# Altium PCB Sound_Sensor.PcbDoc (part 1 of 3)
Units mil, origin at the board's own origin, x right, y up, seen from the top; angles counter-clockwise.
Board outline 3543.31 x 3543.31 mil, 2 copper layers (Top Layer, Bottom Layer), stack 57 mil thick; 199 components, 167 nets, 606 pads, 246 vias.
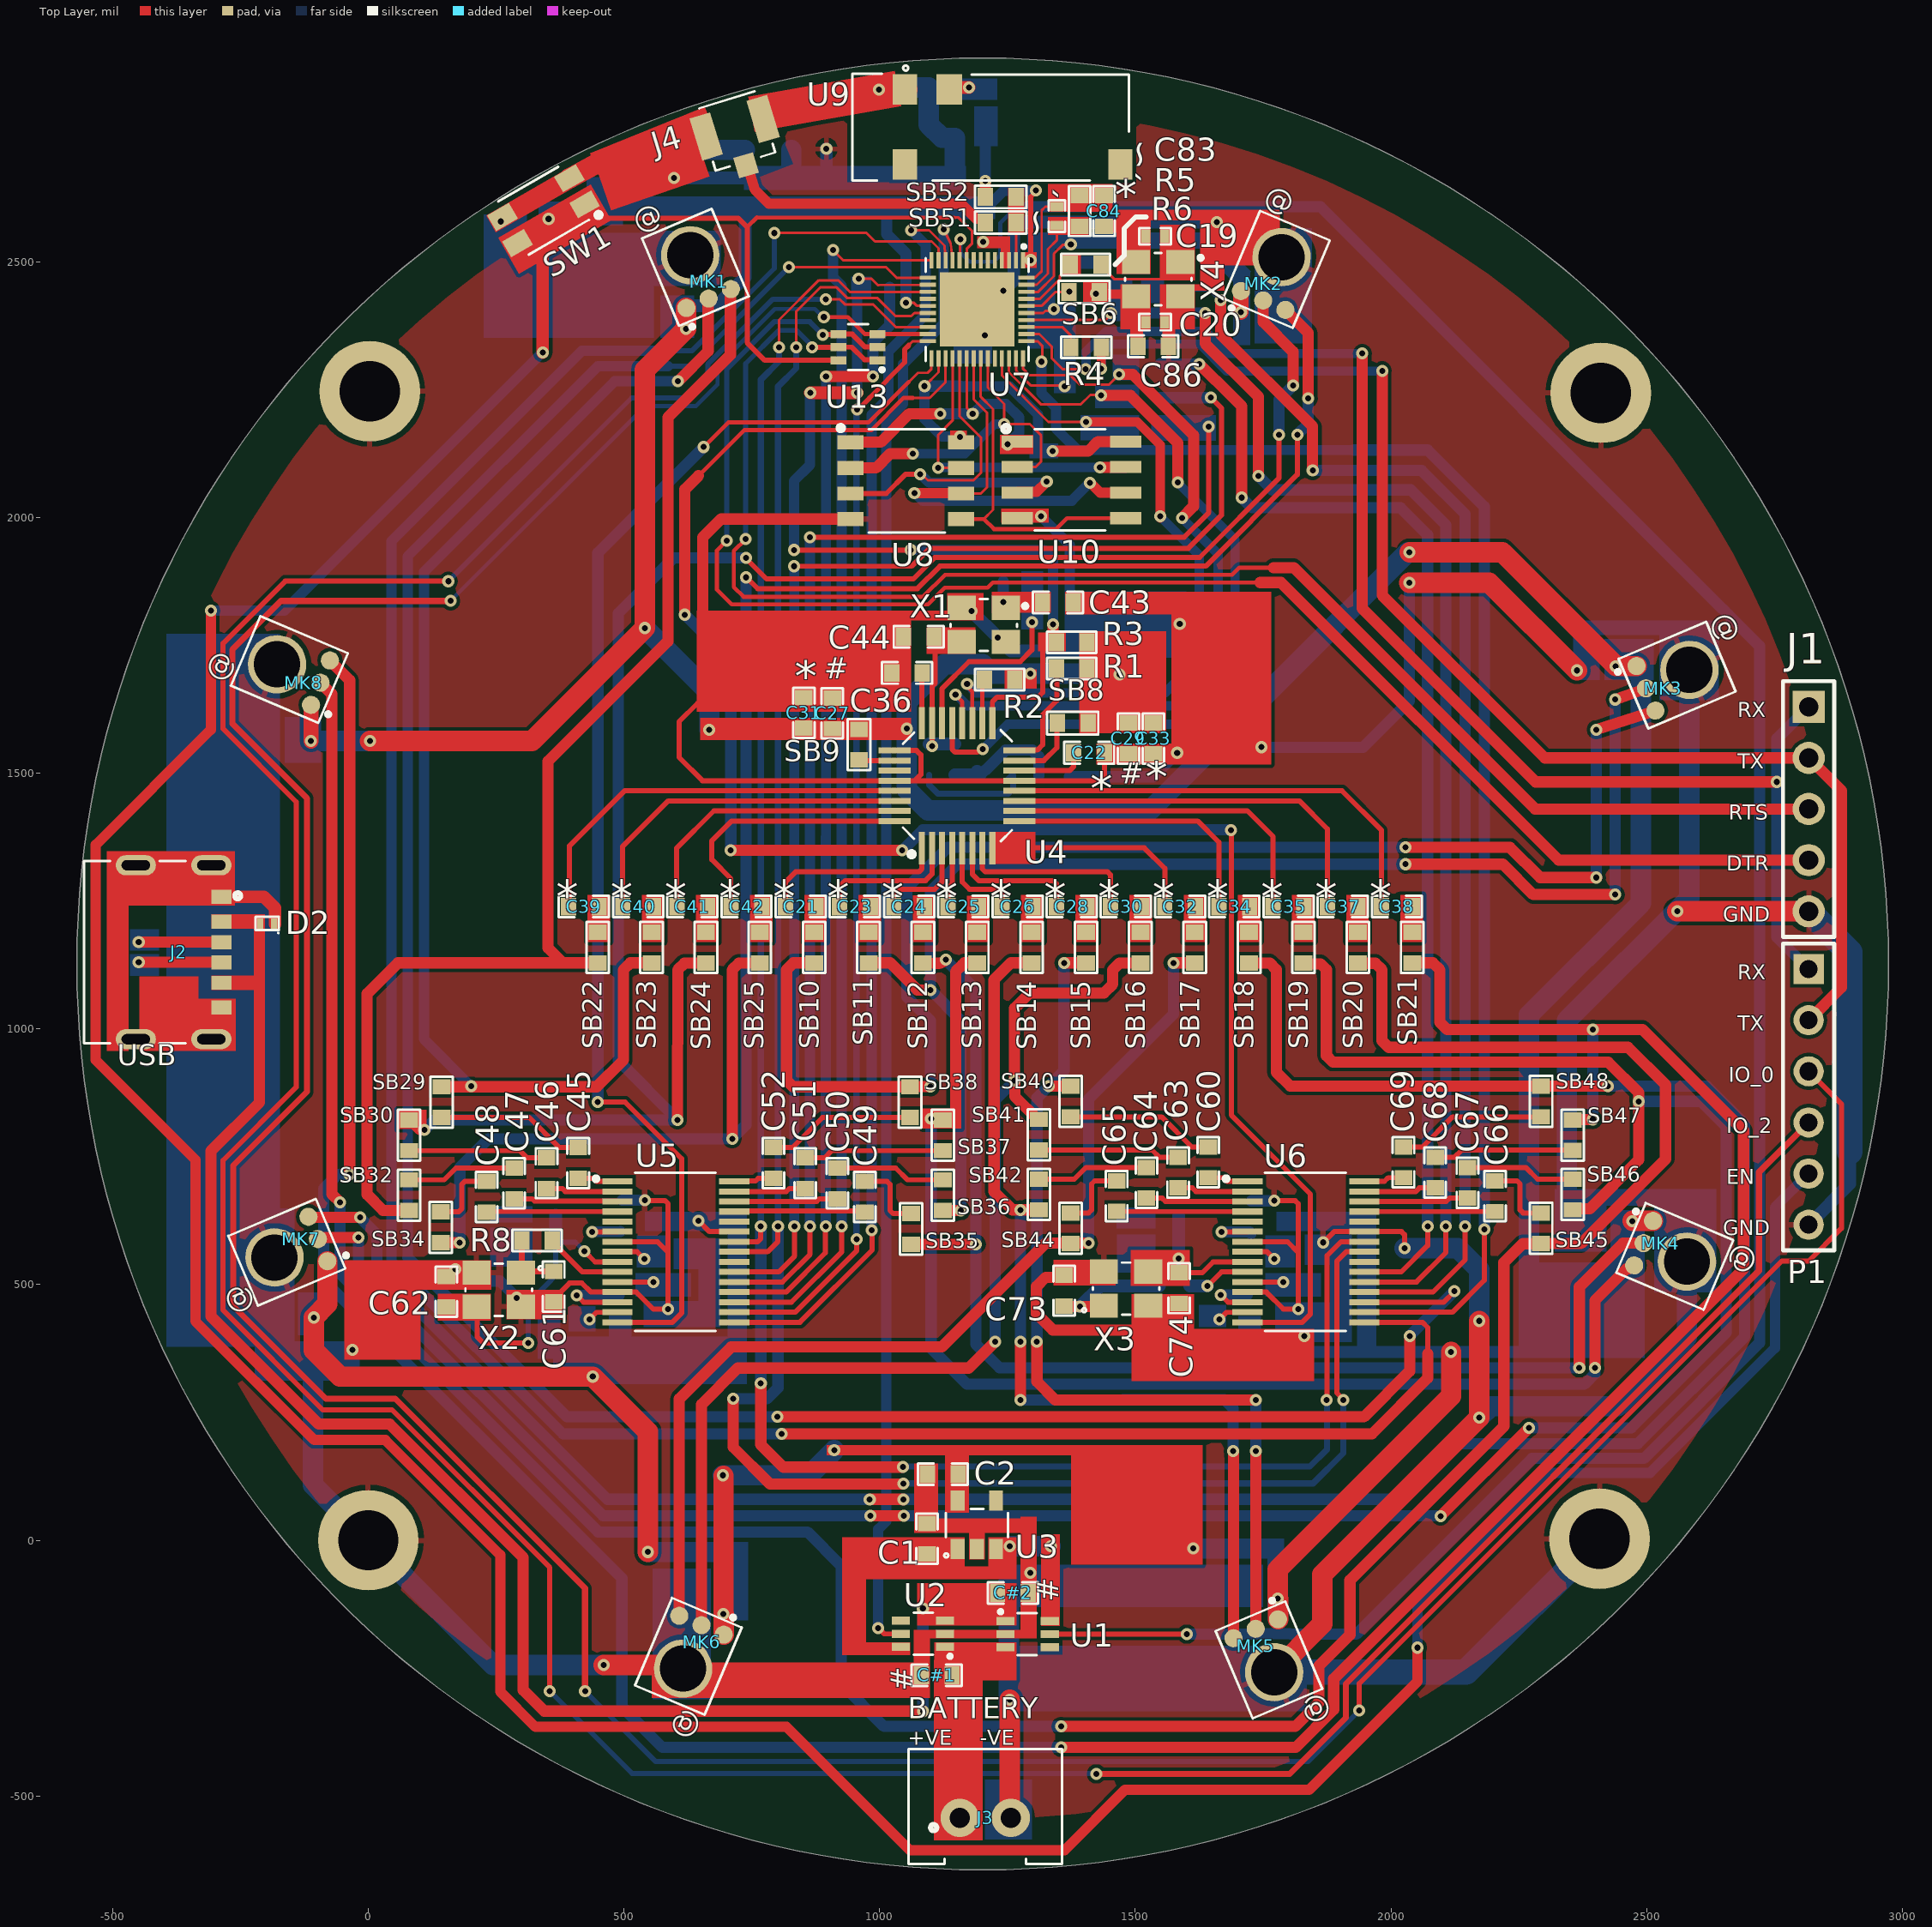
[diagram p0: Top Layer view]
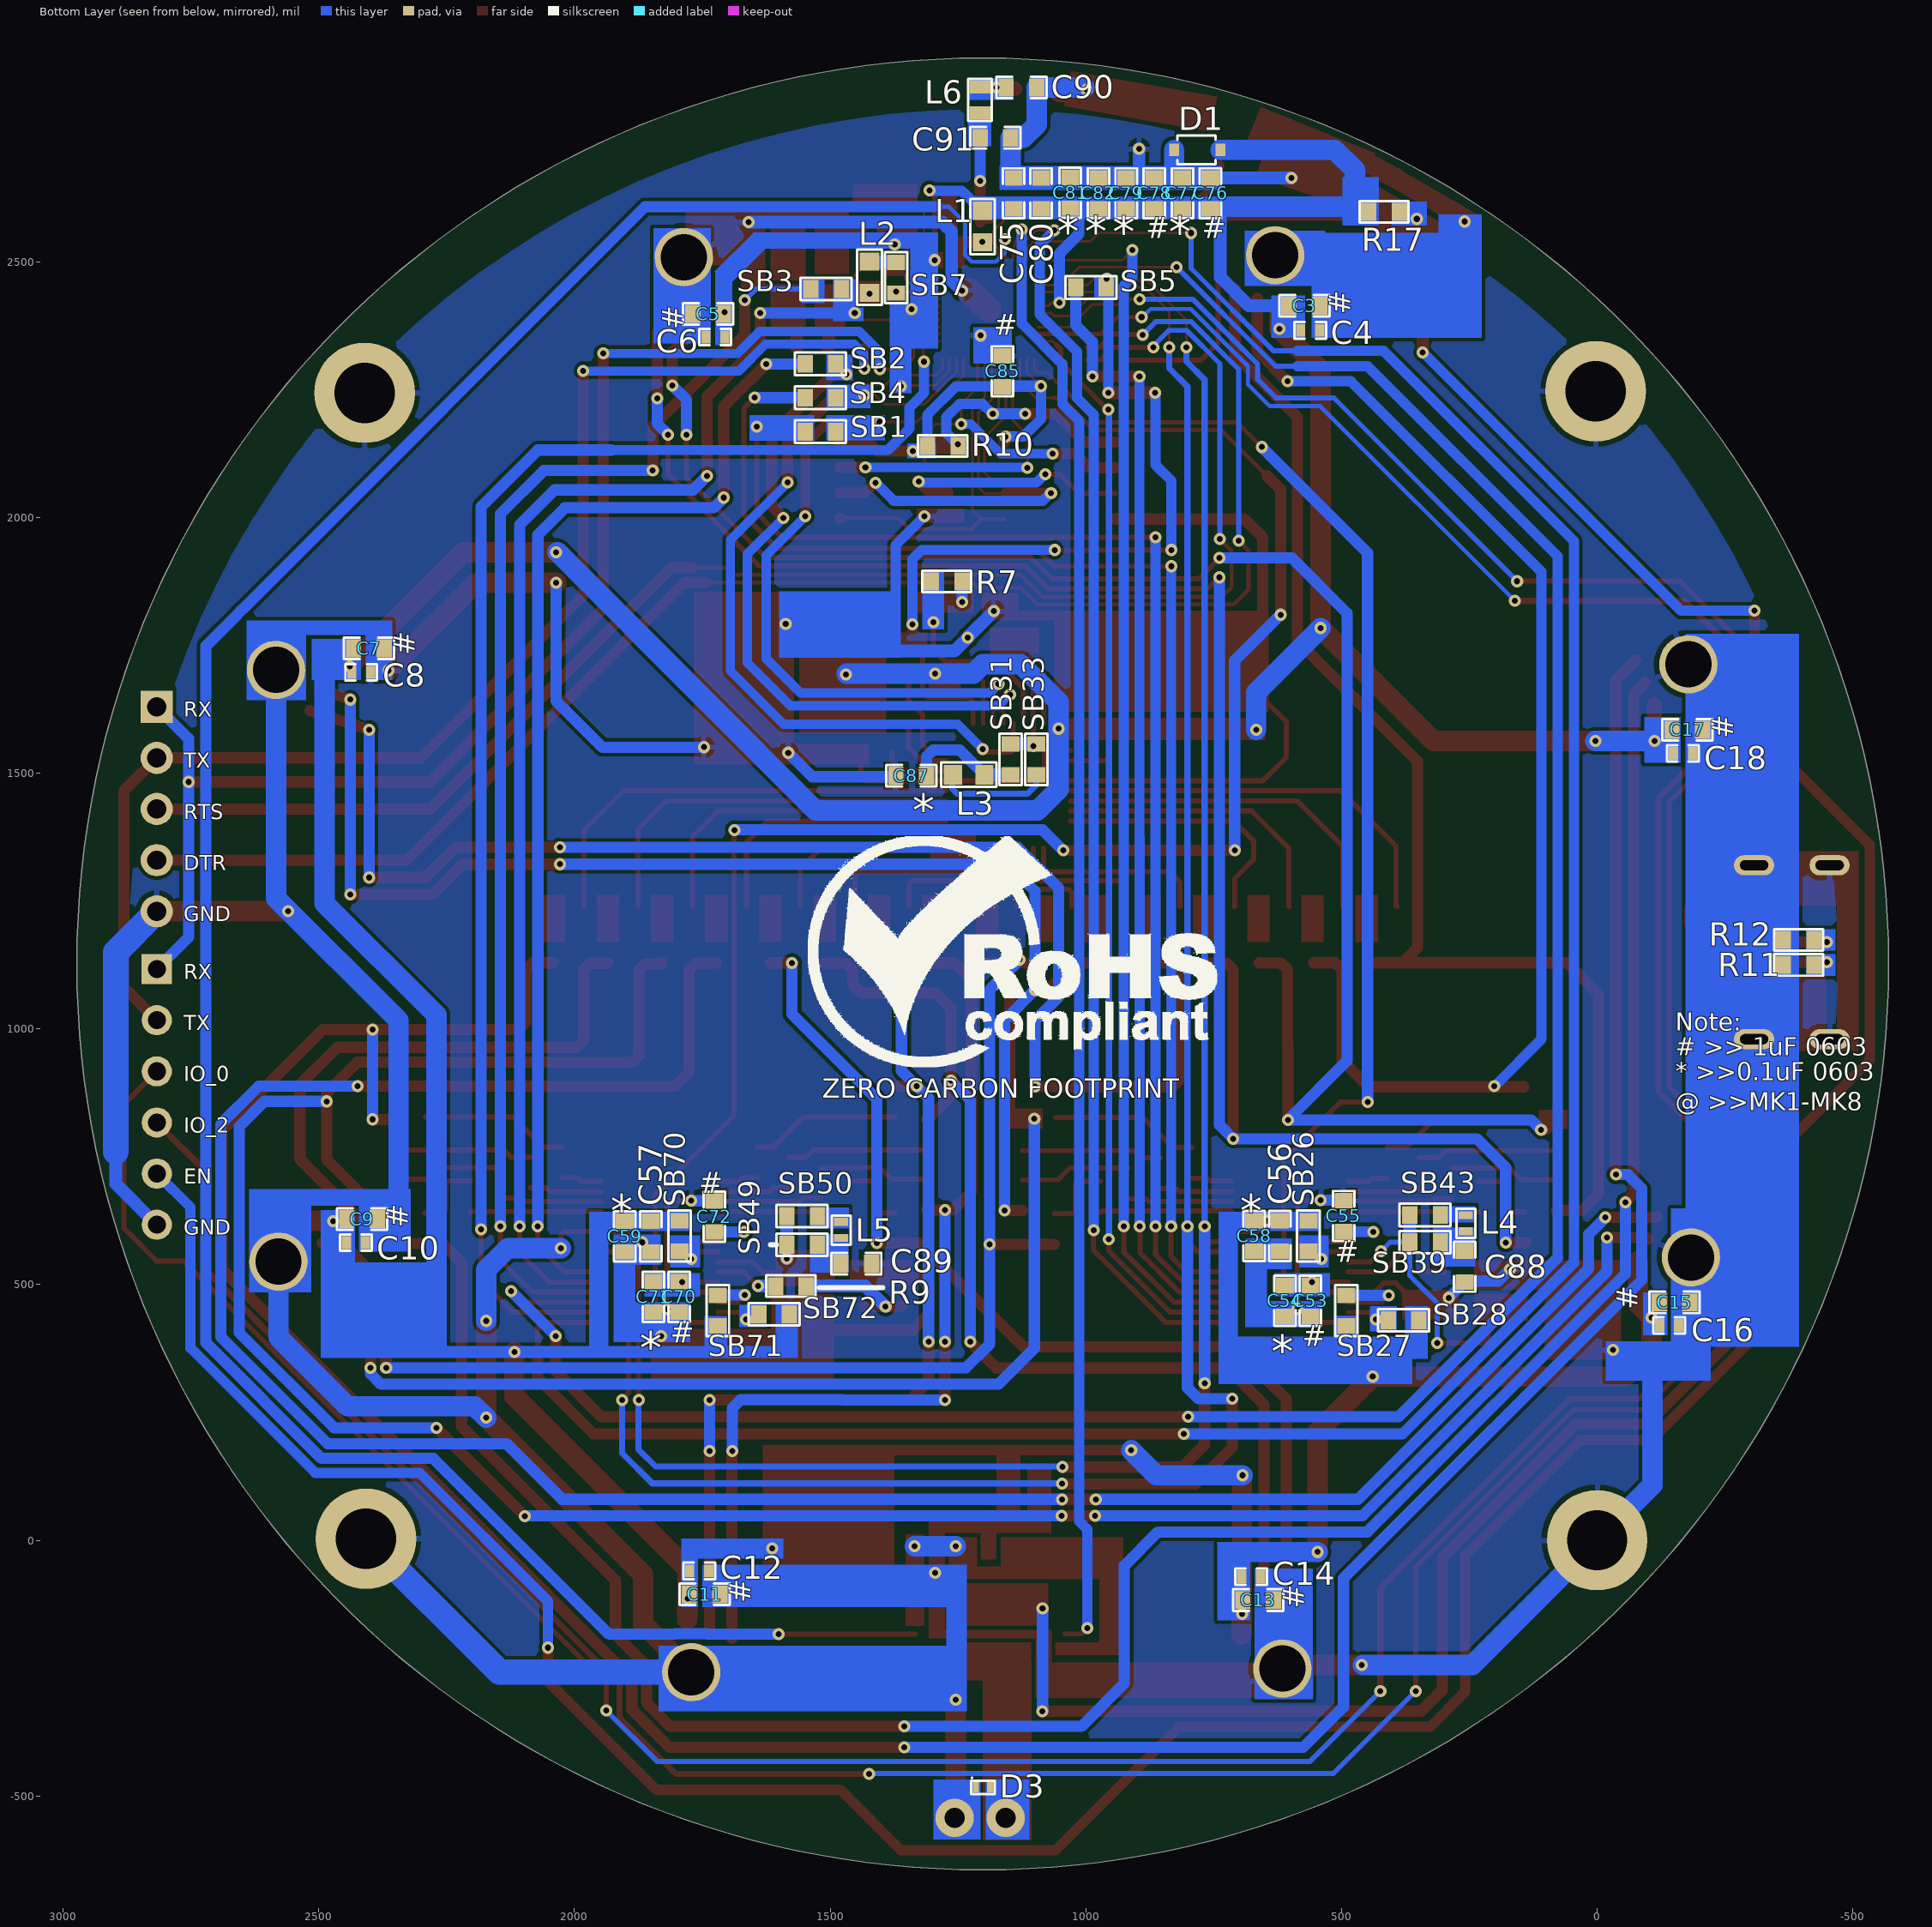
[diagram p1: Bottom Layer view, seen from below]
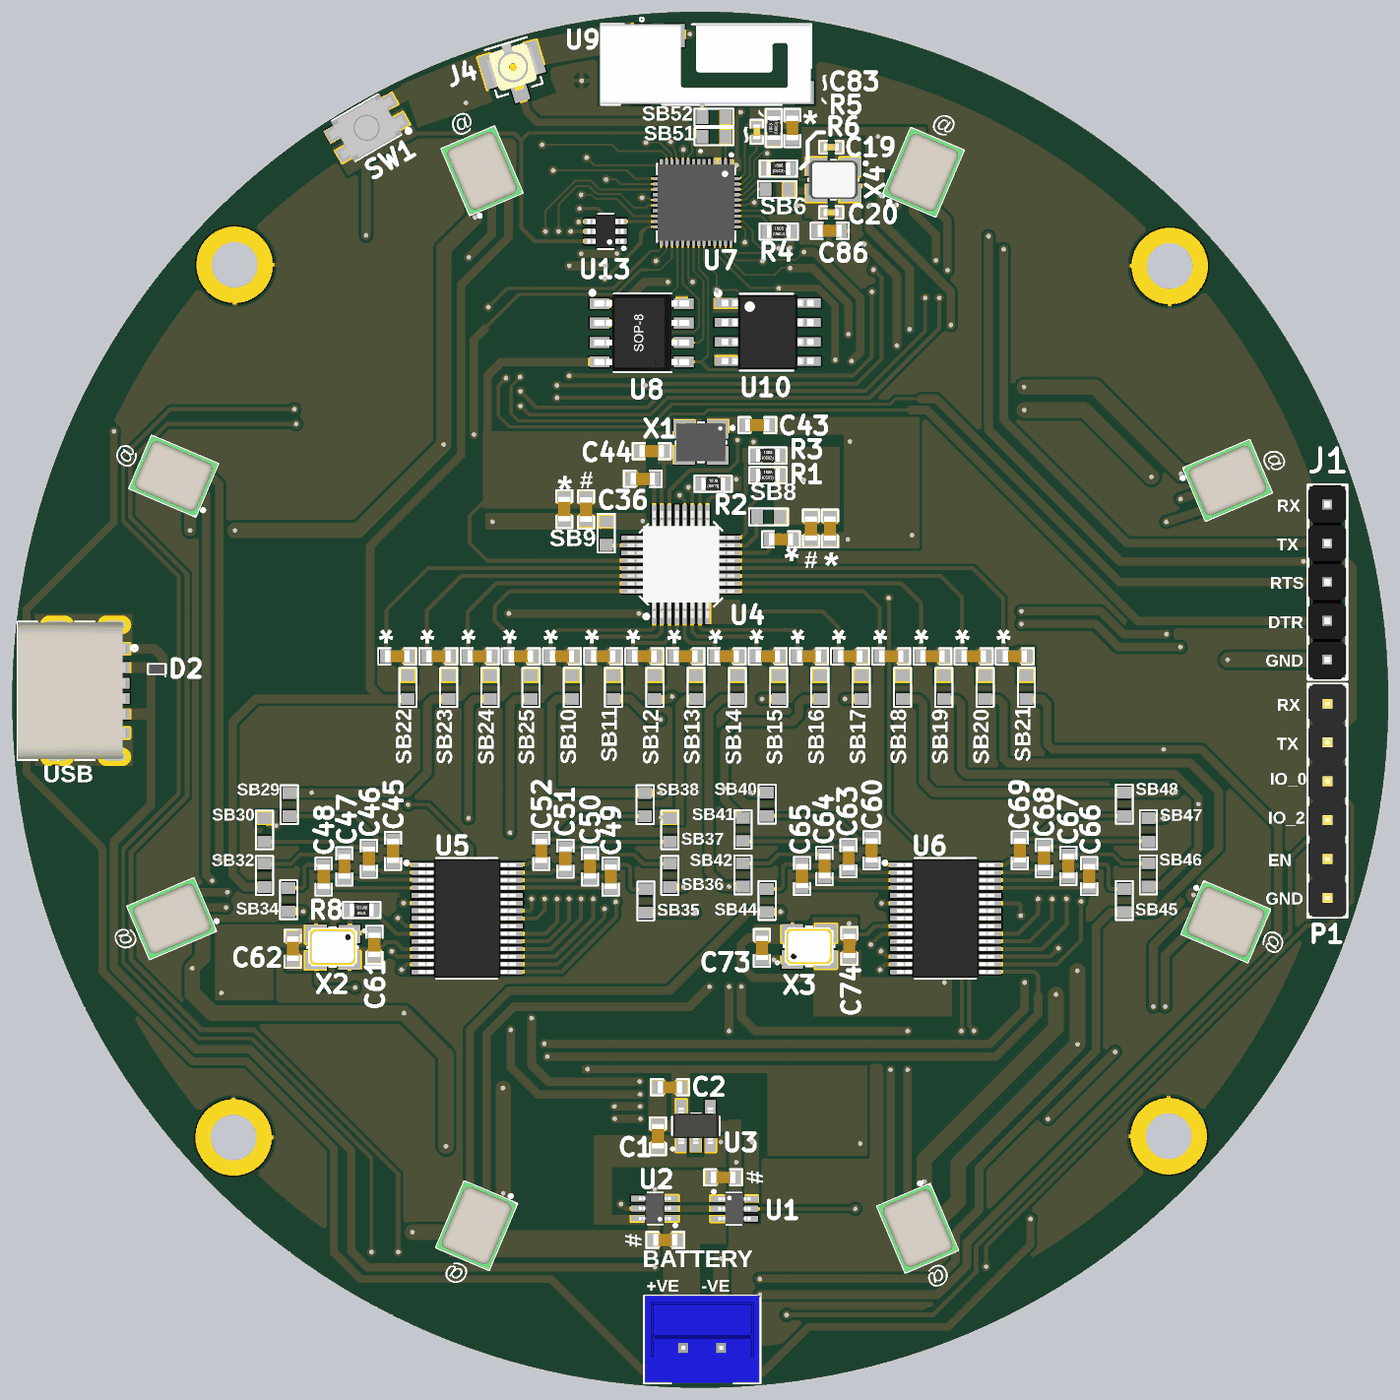
[diagram p3: 3D render of the assembled board from above, using the file's embedded part models]
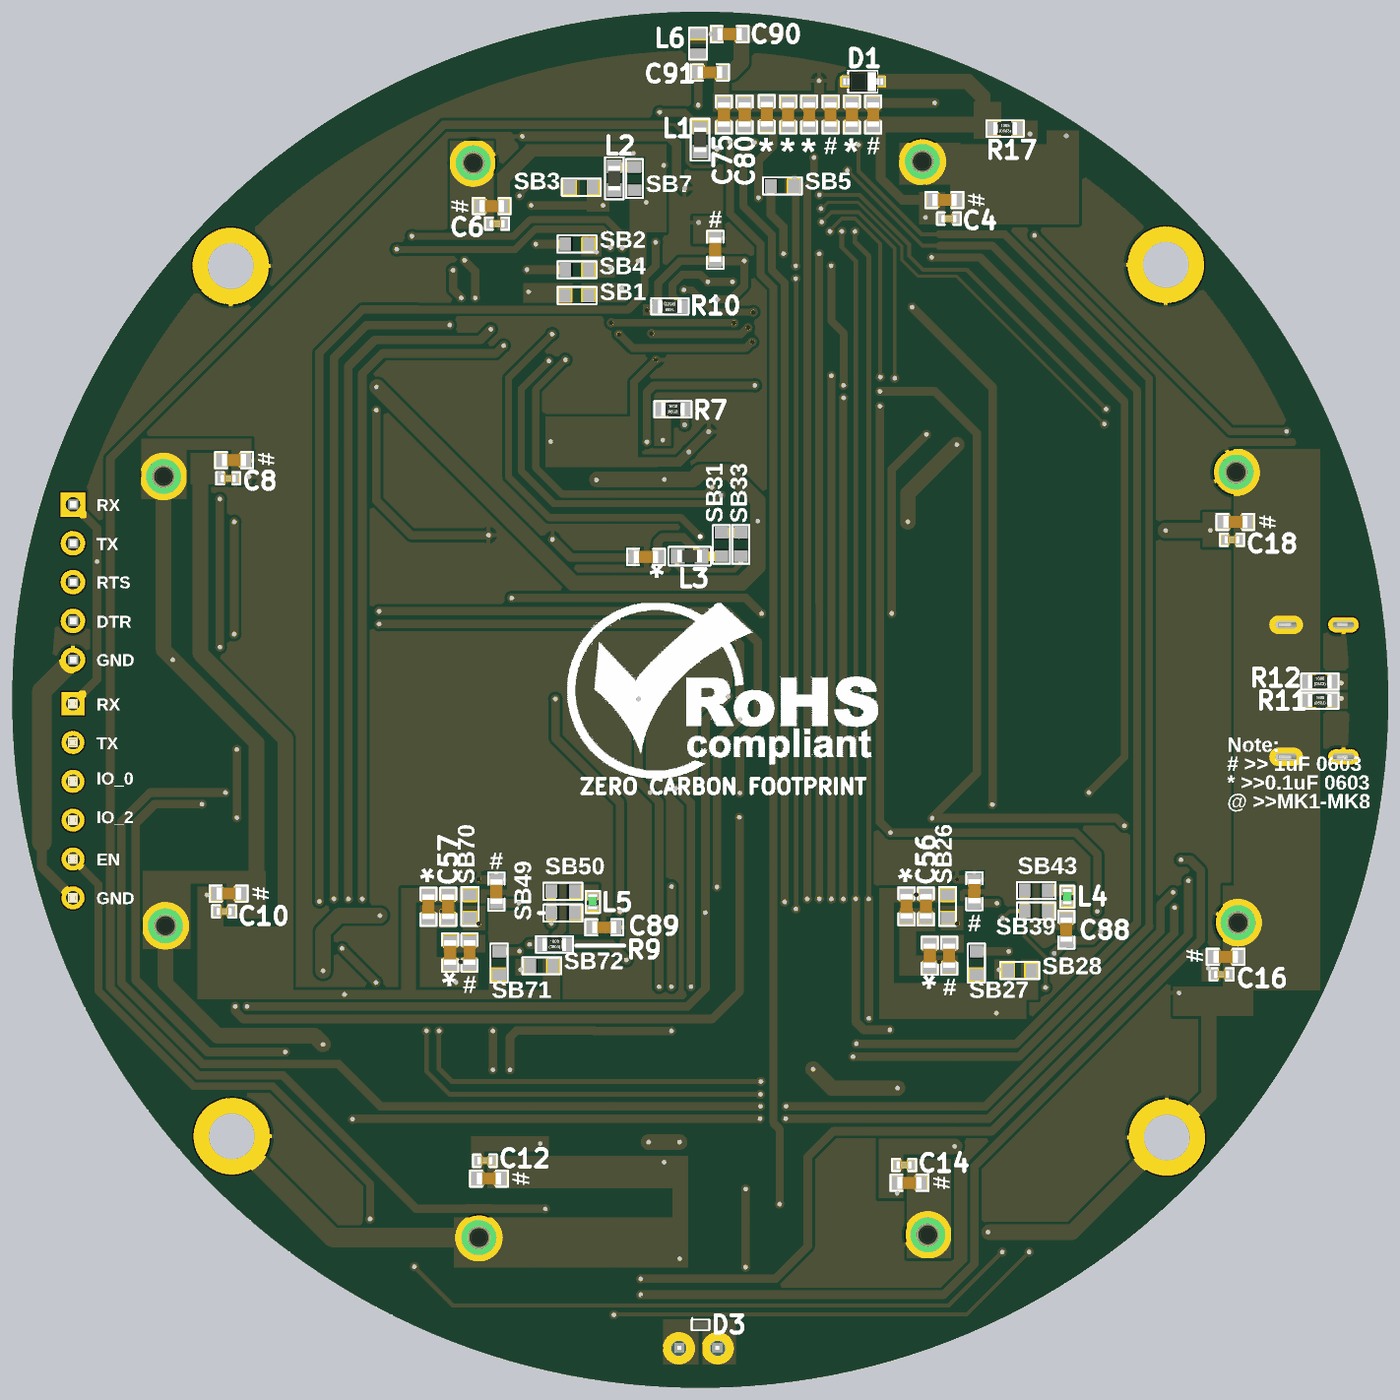
[diagram p4: 3D render of the assembled board from below, using the file's embedded part models]

## Layer stack, top to bottom
Top Solder: solder mask 3, Solder Resist, Dk 3.5
Top Layer: signal copper 10
Dielectric 1: dielectric 37, FR-4, Dk 4.8
Bottom Layer: signal copper 10
Bottom Solder: solder mask 3, Solder Resist, Dk 3.5

## Board outline
-569.96,1127.06 ccw(c1201.69,1127.06) 1201.69,-644.59 ccw(c1201.69,1127.06) 2973.35,1127.06 ccw(c1201.69,1127.06) 1201.69,2898.72 ccw(c1201.69,1127.06)

## Design rules (kind name [scope] priority, off if disabled: settings)
Clearance [All] p1: gap=7 ignorepadtopadclearanceinfootprint=FALSE except(0: Arc-Hole Track-Hole SMDPad-Hole THPad-Hole Via-Hole Fill-Hole Poly-Hole Region-Hole Text-Hole; 4: Arc-SMDPad Track-SMDPad SMDPad-SMDPad)
ComponentClearance [All] p1: gap=0 collisioncheckmode=3 verticalgap=0 showdistances=FALSE
HoleSize [All] p1: absolutevalues=TRUE maxlimit=1000 minlimit=1 maxpercent=80.000 minpercent=20.000
HoleToHoleClearance [All] p1: gap=0 allowstackedmicrovias=TRUE
MinimumSolderMaskSliver [All] p1: minsoldermaskwidth=0
PolygonConnect [All] p1: connectstyle=Relief reliefconductorwidth=10 reliefentries=4 polygonreliefangle="90 Angle" airgapwidth=10
RoutingVias [All] p1: holewidth=11.81 width=23.62 viastyle="Through Hole" minholewidth=11.81 minwidth=23.62 maxholewidth=11.81 maxwidth=23.62
SilkToSilkClearance [All] p1: silktosilkclearance=0
SilkToSolderMaskClearance [IsPad] p1: minsilkscreentomaskgap=0 clearancetoexposedcopper=TRUE
SolderMaskExpansion [All] p1: expansion=4 istentingtop=FALSE
Width [All] p1: maxlimit=50 minlimit=5 preferedwidth=22 minimp=50.000000 maximp=50.000000 favimp=50.000000
24 further rules are at their usual default settings.

## Classes and differential pairs
component class U_Memory_Section: R10 U8 U10
component class U_Sensor_Sheet: C3 C4 C5 C6 C7 C8 C9 C10 C11 C12 C13 C14 C15 C16 C17 C18 MK1 MK2 MK3 MK4 MK5 MK6 MK7 MK8
component class U_Power_Section: C1 C2 C#1 C#2 U1 U2 U3
component class U_Controller_Sheet: C19 C20 C75 C76 C77 C78 C79 C80 C81 C82 C83 C84 C85 C86 D1 L1 L2 R4 R5 R6 R17 SB1 SB2 SB3 SB4 SB5 SB6 SB7 SSS SW1 U7 U13 X4
component class U_Connector_Sheet: C90 C91 D2 D3 J1 J2 j2 J3 J4 L6 P1 R11 R12 SB51 SB52 U9
component class U_ADC_2_Section: C45 C46 C47 C48 C49 C50 C51 C52 C53 C54 C55 C56 C57 C58 C59 C60 C61 C62 C63 C64 C65 C66 C67 C68 C69 C70 C71 C72 C73 C74 C88 C89 L4 L5 R8 R9 SB26 SB27 SB28 SB29 SB30 SB32 SB34 SB35 SB36 SB37 SB38 SB39 SB40 SB41 SB42 SB43 SB44 SB45 SB46 SB47 SB48 SB49 SB50 SB70 SB71 SB72 SSS U5 U6 X2 X3
component class U_ADC_1_Section: C21 C22 C23 C24 C25 C26 C27 C28 C29 C30 C31 C32 C33 C34 C35 C36 C37 C38 C39 C40 C41 C42 C43 C44 C87 L3 R1 R2 R3 R7 SB8 SB9 SB10 SB11 SB12 SB13 SB14 SB15 SB16 SB17 SB18 SB19 SB20 SB21 SB22 SB23 SB24 SB25 SB31 SB33 SSS U4 X1

## Components (designator, comment, footprint, x,y, rotation, side; value= is the part's Value field where it differs from the comment)
C1 "10uF" "Cap 0603" 1092.69,3.06 r90 top locked
C2 "4.7UF" "Cap 0603" 1123.69,129.06 r180 top locked
C3 "1uF" "Cap 0603" 572.69,2414.06 r180 bottom locked
C4 "220pF" "Cap 0402" 561.19,2366.06 r180 bottom locked
C5 "1uF" "Cap 0603" 1738.69,2398.06 r0 bottom locked
C6 "220pF" "Cap 0402" 1724.69,2353.06 r0 bottom locked
C7 "1uF" "Cap 0603" 2402.19,1744.06 r180 bottom locked
C8 "220pF" "Cap 0402" 2417.19,1697.06 r180 bottom locked
C9 "1uF" "Cap 0603" 2415.69,628.06 r180 bottom locked
C10 "220pF" "Cap 0402" 2427.69,582.06 r180 bottom locked
C11 "1uF" "Cap 0603" 1745.69,-105.94 r180 bottom locked
C12 "220pF" "Cap 0402" 1756.19,-59.94 r180 bottom locked
C13 "1uF" "Cap 0603" 663.19,-116.94 r180 bottom locked
C14 "220pF" "Cap 0402" 676.69,-70.94 r180 bottom locked
C15 "1uF" "Cap 0603" -151.31,465.06 r180 bottom locked
C16 "220pF" "Cap 0402" -140.81,420.06 r180 bottom locked
C17 "1uF" "Cap 0603" -176.31,1585.06 r180 bottom locked
C18 "220pF" "Cap 0402" -167.81,1539.06 r180 bottom locked
C19 "22PF" "Cap 0402" 1539,2550 r0 top locked
C20 "22PF" "Cap 0402" 1539,2382 r180 top locked
C21 "0.1uF" "Cap 0603" 845.69,1239.06 r180 top locked
C22 "0.1uF" "Cap 0603" 1409.69,1540.06 r0 top locked
C23 "0.1uF" "Cap 0603" 951.69,1239.06 r180 top locked
C24 "0.1uF" "Cap 0603" 1057.69,1239.06 r180 top locked
C25 "0.1uF" "Cap 0603" 1163.69,1239.06 r180 top locked
C26 "0.1uF" "Cap 0603" 1269.69,1239.06 r180 top locked
C27 "1uF" "Cap 0603" 907.69,1617.06 r90 top locked
C28 "0.1uF" "Cap 0603" 1375.69,1239.06 r180 top locked
C29 "1uF" "Cap 0603" 1486.69,1568.06 r270 top locked
C30 "0.1uF" "Cap 0603" 1481.69,1239.06 r180 top locked
C31 "0.1uF" "Cap 0603" 851.69,1618.06 r90 top locked
C32 "0.1uF" "Cap 0603" 1587.69,1239.06 r180 top locked
C33 "0.1uF" "Cap 0603" 1535.69,1568.06 r270 top locked
C34 "0.1uF" "Cap 0603" 1693.69,1239.06 r180 top locked
C35 "0.1uF" "Cap 0603" 1799.69,1239.06 r180 top locked
C36 "220nF" "Cap 0603" 1053.69,1696.06 r180 top locked
C37 "0.1uF" "Cap 0603" 1905.69,1239.06 r180 top locked
C38 "0.1uF" "Cap 0603" 2011.69,1239.06 r180 top locked
C39 "0.1uF" "Cap 0603" 421.69,1239.06 r180 top locked
C40 "0.1uF" "Cap 0603" 527.69,1239.06 r180 top locked
C41 "0.1uF" "Cap 0603" 633.69,1239.06 r180 top locked
C42 "0.1uF" "Cap 0603" 739.69,1239.06 r180 top locked
C43 "18pF" "Cap 0603" 1348.69,1834.06 r180 top locked
C44 "18pF" "Cap 0603" 1076.69,1767.06 r0 top locked
C45 "680nF" "Cap 0603" 410.52,737.86 r270 top locked
C46 "680nF" "Cap 0603" 348.52,717.86 r270 top locked
C47 "680nF" "Cap 0603" 285.52,697.86 r270 top locked
C48 "680nF" "Cap 0603" 231.78,671.6 r270 top locked
C49 "680nF" "Cap 0603" 971.26,671.6 r270 top locked
C50 "680nF" "Cap 0603" 917.52,697.86 r270 top locked
C51 "680nF" "Cap 0603" 854.52,717.86 r270 top locked
C52 "680nF" "Cap 0603" 792.52,737.86 r270 top locked
C53 "1uF" "Cap 0603" 560.69,468.06 r90 bottom locked
C54 "0.1uF" "Cap 0603" 610.69,468.06 r90 bottom locked
C55 "1uF" "Cap 0603" 495.69,634.06 r90 bottom locked
C56 "10uF" "Cap 0603" 620.69,595.06 r270 bottom locked
C57 "10uF" "Cap 0603" 1850.69,594.06 r270 bottom locked
C58 "0.1uF" "Cap 0603" 670.69,595.06 r270 bottom locked
C59 "0.1uF" "Cap 0603" 1901.69,594.06 r270 bottom locked
C60 "680nF" "Cap 0603" 1642.69,739.06 r270 top locked
C61 "18pF" "Cap 0603" 362.69,496.06 r90 top locked
C62 "18pF" "Cap 0603" 152.69,486.06 r270 top locked
C63 "680nF" "Cap 0603" 1583.69,719.06 r270 top locked
C64 "680nF" "Cap 0603" 1521.69,699.06 r270 top locked
C65 "680nF" "Cap 0603" 1463.69,673.06 r270 top locked
C66 "680nF" "Cap 0603" 2203.43,672.8 r270 top locked
C67 "680nF" "Cap 0603" 2149.69,699.06 r270 top locked
C68 "680nF" "Cap 0603" 2086.69,719.06 r270 top locked
C69 "680nF" "Cap 0603" 2024.69,739.06 r270 top locked
C70 "1uF" "Cap 0603" 1795.69,476.06 r90 bottom locked
C71 "0.1uF" "Cap 0603" 1845.69,476.06 r90 bottom locked
C72 "1uF" "Cap 0603" 1726.69,633.06 r90 bottom locked
C73 "18pF" "Cap 0603" 1360.69,488.06 r270 top locked
C74 "18pF" "Cap 0603" 1585.69,493.06 r90 top locked
C75 "10uF'" "Cap 0603" 1141,2634 r90 bottom locked
C76 "1uF" "Cap 0603" 756.31,2634 r90 bottom locked
C77 "0.1uF" "Cap 0603" 811.26,2634 r90 bottom locked
C78 "1uF" "Cap 0603" 866.22,2634 r90 bottom locked
C79 "0.1uF" "Cap 0603" 921.18,2634 r90 bottom locked
C80 "100pF" "Cap 0603" 1087.31,2634 r90 bottom locked
C81 "0.1uF" "Cap 0603" 1030.31,2635 r90 bottom locked
C82 "0.1uF" "Cap 0603" 975.31,2634 r90 bottom locked
C83 "3.3nF" "Cap 0402" 1347,2589.5 r90 top locked
C84 "0.1uF" "Cap 0603" 1439,2599.5 r270 top locked
C85 "1uF" "Cap 0603" 1163,2286 r90 bottom locked
C86 "4.7nF" "Cap 0603" 1535,2335 r0 top locked
C87 "0.1uF" "Cap 0603" 1341.5,1495 r180 bottom locked
C88 "33nF" "Cap 0603" 259,535 r90 bottom locked
C89 "33nF" "Cap 0603" 1449,541 r0 bottom locked
C90 "2.7pF" "Cap 0603" 1126,2841 r180 bottom locked
C91 "4.7pF" "Cap 0603" 1177.02,2742.57 r180 bottom locked
C#1 "1uF" "Cap 0603" 1111.69,-263.94 r180 top locked
C#2 "1uF" "Cap 0603" 1260.69,-102.94 r0 top locked
D1 "UDD32C03L01" UDD32C03L01 782,2719 r0 bottom locked
D2 "TPD1E10B06DPYR" "X1SON - 0.45 mm max height" -197.78,1206 r180 top locked
D3 "TPD1E10B06DPYR" "X1SON - 0.45 mm max height" 1201,-483 r180 bottom locked
J1 "3-644456-5" HDR1X5 2817,1630 r270 top
J2 "U262-061N-4BVC11" U262-061N-4BVC11 -371,1150 r270 top locked
J3 "JST Connector" "JST Connector" 1156.69,-542.94 r0 top locked
J4 "U.FL-R-SMT-1(80)" U.FL-R-SMT-1(80) 728.24,2723.68 r17 top locked
L1 "2nH" "IND 0603" 1202,2569.09 r270 bottom locked
L2 "3.3nH" "IND 0603" 1423,2470 r270 bottom locked
L3 "3.3nH" "IND 0603" 1229,1497 r180 bottom locked
L4 "1.2nH" "IND 0402" 257,620 r270 bottom locked
L5 "1.2nH" "IND 0402" 1479,607 r270 bottom locked
L6 "1.6nH" FHW0603UC1N6KST 1207.02,2816.57 r270 bottom locked
MK1 "ICS-40730" ICS-40730 647.69,2470.66 r113 top locked
MK2 "ICS-40730" ICS-40730 1768.18,2466.89 r67 top locked
MK3 "ICS-40730" ICS-40730 2541.29,1684.06 r23 top locked
MK4 "ICS-40730" ICS-40730 2536.6,563 r337 top locked
MK5 "ICS-40730" ICS-40730 1753.69,-215.54 r293 top locked
MK6 "ICS-40730" ICS-40730 633.69,-208.54 r247 top locked
MK7 "ICS-40730" ICS-40730 -140.91,571.06 r203 top locked
MK8 "ICS-40730" ICS-40730 -135.91,1695.06 r157 top locked
P1 "61300611121" HDR1X6 2817,1117 r270 top locked
R1 "100K" Res0603 1375.69,1705.06 r180 top locked
R2 "100K" Res0603 1234.9,1683.27 r180 top locked
R3 "100K" Res0603 1375.69,1756.06 r180 top locked
R4 "499R" Res0603 1404,2333 r180 top locked
R5 "20K" Res0603 1391,2599.5 r270 top locked
R6 "0R" Res0603 1403,2495 r180 top locked
R7 "0R" Res0603 1272,1875 r0 bottom locked
R8 "0R" Res0603 330,586 r0 top locked
R9 "0R" Res0603 1577,497 r0 bottom locked
R10 "10K" Res0603 1280,2140 r180 bottom locked
R11 "5.1K" Res0603 -394,1125 r0 bottom
R12 "5.1K" Res0603 -394,1174 r0 bottom
R17 "10K" Res0603 416.69,2598.06 r0 bottom locked
SB1 "Solder Bridge" "Solder Bridge" 1519,2168 r180 bottom locked
SB2 "Solder Bridge" "Solder Bridge" 1519,2300.67 r180 bottom locked
SB3 "Solder Bridge" "Solder Bridge" 1508,2447 r180 bottom locked
SB4 "Solder Bridge" "Solder Bridge" 1519,2234.33 r180 bottom locked
SB5 "Solder Bridge" "Solder Bridge" 990,2450 r180 bottom locked
SB6 "Solder Bridge" "Solder Bridge" 1400,2441 r0 top locked
SB7 "Solder Bridge" "Solder Bridge" 1371,2469 r90 bottom locked
SB8 "Solder Bridge" "Solder Bridge" 1377.69,1598.06 r180 top locked
SB9 "Solder Bridge" "Solder Bridge" 959.69,1556.06 r270 top locked
SB10 "Solder Bridge" "Solder Bridge" 872.03,1159.06 r90 top locked
SB11 "Solder Bridge" "Solder Bridge" 978.36,1159.06 r90 top locked
SB12 "Solder Bridge" "Solder Bridge" 1084.69,1159.06 r90 top locked
SB13 "Solder Bridge" "Solder Bridge" 1191.03,1159.06 r90 top locked
SB14 "Solder Bridge" "Solder Bridge" 1297.36,1159.06 r90 top locked
SB15 "Solder Bridge" "Solder Bridge" 1403.69,1159.06 r90 top locked
SB16 "Solder Bridge" "Solder Bridge" 1510.03,1159.06 r90 top locked
SB17 "Solder Bridge" "Solder Bridge" 1616.36,1159.06 r90 top locked
SB18 "Solder Bridge" "Solder Bridge" 1722.69,1159.06 r90 top locked
SB19 "Solder Bridge" "Solder Bridge" 1829.03,1159.06 r90 top locked
SB20 "Solder Bridge" "Solder Bridge" 1935.36,1159.06 r90 top locked
SB21 "Solder Bridge" "Solder Bridge" 2041.69,1159.06 r90 top locked
SB22 "Solder Bridge" "Solder Bridge" 448.69,1159.06 r90 top locked
SB23 "Solder Bridge" "Solder Bridge" 554.03,1159.06 r90 top locked
SB24 "Solder Bridge" "Solder Bridge" 660.36,1159.06 r90 top locked
SB25 "Solder Bridge" "Solder Bridge" 765.69,1159.06 r90 top locked
SB26 "Solder Bridge" "Solder Bridge" 564.69,595.06 r270 bottom locked
SB27 "Solder Bridge" "Solder Bridge" 490.69,449.06 r90 bottom locked
SB28 "Solder Bridge" "Solder Bridge" 378.69,430.06 r0 bottom locked
SB29 "Solder Bridge" "Solder Bridge" 143.52,856.86 r270 top locked
SB30 "Solder Bridge" "Solder Bridge" 79.52,791.86 r270 top locked
SB31 "Solder Bridge" "Solder Bridge" 1147,1527 r270 bottom locked
SB32 "Solder Bridge" "Solder Bridge" 79.52,674.86 r90 top locked
SB33 "Solder Bridge" "Solder Bridge" 1097,1527 r270 bottom locked
SB34 "Solder Bridge" "Solder Bridge" 141.69,612.06 r90 top locked
SB35 "Solder Bridge" "Solder Bridge" 1061.52,608.86 r90 top locked
SB36 "Solder Bridge" "Solder Bridge" 1123.52,674.86 r90 top locked
SB37 "Solder Bridge" "Solder Bridge" 1123.52,791.86 r270 top locked
SB38 "Solder Bridge" "Solder Bridge" 1059.52,856.86 r270 top locked
SB39 "Solder Bridge" "Solder Bridge" 336.52,582.86 r180 bottom locked
SB40 "Solder Bridge" "Solder Bridge" 1373.69,858.06 r270 top locked
SB41 "Solder Bridge" "Solder Bridge" 1311.69,793.06 r270 top locked
SB42 "Solder Bridge" "Solder Bridge" 1311.69,676.06 r90 top locked
SB43 "Solder Bridge" "Solder Bridge" 336.52,636 r180 bottom locked
SB44 "Solder Bridge" "Solder Bridge" 1373.69,610.06 r90 top locked
SB45 "Solder Bridge" "Solder Bridge" 2293.69,610.06 r90 top locked
SB46 "Solder Bridge" "Solder Bridge" 2355.69,676.06 r90 top locked
SB47 "Solder Bridge" "Solder Bridge" 2355.69,792.06 r270 top locked
SB48 "Solder Bridge" "Solder Bridge" 2293.69,858.06 r270 top locked
SB49 "Solder Bridge" "Solder Bridge" 1555,578 r180 bottom locked
SB50 "Solder Bridge" "Solder Bridge" 1555,634 r180 bottom locked
SB51 "Solder Bridge" "Solder Bridge" 1237,2577 r180 top locked
SB52 "Solder Bridge" "Solder Bridge" 1237,2627 r180 top locked
SB70 "Solder Bridge" "Solder Bridge" 1794.69,595.06 r270 bottom locked
SB71 "Solder Bridge" "Solder Bridge" 1719.69,449.06 r90 bottom locked
SB72 "Solder Bridge" "Solder Bridge" 1609.69,442.06 r0 bottom locked
SW1 "TS-1185EC-C-D-B" TS-1185EC-C-D-B 342.69,2600.06 r210 top locked
U1 "LM66100DCKR" SC70-6 1289.69,-183.67 r0 top locked
U2 "LM66100DCKR" SC70-6 1084.69,-182.94 r180 top locked
U3 "XC6220B331MR-G" SOT-25 1190.29,30.31 r90 top locked
U4 "ADS131M08IPBSR" 32TQFP 1151.69,1475.56 r90 top locked
U5 "PCM1865DBTR" PCM1865DBTR 601.52,564.06 r0 top locked
U6 "PCM1865DBTR" PCM1865DBTR 1833.69,564.06 r0 top locked
U7 "ESP32-D0WD-V3" ESP32-D0WD-V3 1191,2407 r270 top locked
U8 "MX25L8006EM2I-12G" SOP-8 1051,2072 r0 top locked
U9 "PRO-OB-440" PRO-OB-440 1260,2764 r90 top locked
U10 "ESP-PSRAM64H" SOIC-8 1375.3,2073.7 r0 top locked
U13 "UMH3N" UMH3N 957.7,2333.14 r180 top locked
X1 "3TJ481920NYLBC" 3TJ481920NYLBC 1203.69,1790.06 r180 top locked
X2 "S3224576121060" S3224576121060 255,490 r180 top value=24.576MHz
X3 "S3224576121060" S3224576121060 1482,492 r0 top value=24.576MHz
X4 "X322540MPB4SI" X322540MPB4SI 1544.75,2466.03 r180 top locked value=40MHZ

## Footprints (in the part's own frame and the unit in brackets; to place one, negate y for a bottom-side part, rotate by r counter-clockwise, add the part's x,y. Pads: shape width x height; smd on the part's side, far side on the other; paste and mask are expansions set on the pad)
3TJ481920NYLBC [mm]
  rect 1.4x1.2 smd mask+0.07: 1(-1.1,-0.85) 2(1.1,-0.85) 3(1.1,0.85) 4(-1.1,0.85)
  silkscreen extent -2.14,-1.3 1.65,1.3, body extent -1.6,-1.25 1.6,1.25, height 0.91
32TQFP [mm]
  rect 1.6x0.3 smd: 1(-3.1,1.75) 2(-3.1,1.25) 3(-3.1,0.75) 4(-3.1,0.25) 5(-3.1,-0.25) 6(-3.1,-0.75) 7(-3.1,-1.25) 8(-3.1,-1.75) 17(3.1,-1.75) 18(3.1,-1.25) 19(3.1,-0.75) 20(3.1,-0.25) 21(3.1,0.25) 22(3.1,0.75) 23(3.1,1.25) 24(3.1,1.75)
  rect 0.3x1.6 smd: 9(-1.75,-3.1) 10(-1.25,-3.1) 11(-0.75,-3.1) 12(-0.25,-3.1) 13(0.25,-3.1) 14(0.75,-3.1) 15(1.25,-3.1) 16(1.75,-3.1) 25(1.75,3.1) 26(1.25,3.1) 27(0.75,3.1) 28(0.25,3.1) 29(-0.25,3.1) 30(-0.75,3.1) 31(-1.25,3.1) 32(-1.75,3.1)
  silkscreen extent -3.53,-2.72 2.77,2.69, body extent -3.5,-3.51 3.5,3.49, height 1.25
"Cap 0402" [mil]
  rect 18x25 smd mask+2.36: 1(-18.5,0) 2(18.5,0)
  silkscreen extent -31,-16 31,16, body extent -20,-10 20,10, height 19
"Cap 0603" [mil]
  rect 30x35 smd mask+2.36: 1(-30,0) 2(30,0)
  silkscreen extent -49,-21 49,21, body extent -32,-16 31,16, height 34
ESP32-D0WD-V3 [mm]
  rect 0.81x0.2 smd: 1(-2.445,2.275) 2(-2.445,1.925) 3(-2.445,1.575) 4(-2.445,1.225) 5(-2.445,0.875) 6(-2.445,0.525) 7(-2.445,0.175) 8(-2.445,-0.175) 9(-2.445,-0.525) 10(-2.445,-0.875) 11(-2.445,-1.225) 12(-2.445,-1.575) 13(-2.445,-1.925) 14(-2.445,-2.275) 25(2.445,-2.275) 26(2.445,-1.925) 27(2.445,-1.575) 28(2.445,-1.225) 29(2.445,-0.875) 30(2.445,-0.525) 31(2.445,-0.175) 32(2.445,0.175) 33(2.445,0.525) 34(2.445,0.875) 35(2.445,1.225) 36(2.445,1.575) 37(2.445,1.925) 38(2.445,2.275)
  rect 0.2x0.81 smd: 15(-1.575,-2.445) 16(-1.225,-2.445) 17(-0.875,-2.445) 18(-0.525,-2.445) 19(-0.175,-2.445) 20(0.175,-2.445) 21(0.525,-2.445) 22(0.875,-2.445) 23(1.225,-2.445) 24(1.575,-2.445) 39(1.575,2.445) 40(1.225,2.445) 41(0.875,2.445) 42(0.525,2.445) 43(0.175,2.445) 44(-0.175,2.445) 45(-0.525,2.445) 46(-0.875,2.445) 47(-1.225,2.445) 48(-1.575,2.445)
  rect 3.7x3.7 smd: 49(0,0)
  silkscreen extent -3.2,-2.55 2.56,2.56, body extent -2.5,-2.5 2.5,2.5, height 0.9
FHW0603UC1N6KST [mm] "700mA 1.6nH ±10% 40mO 0603"
  rect 0.64x1.02 smd: 1(-0.64,0) 2(0.64,0)
  silkscreen extent -1.04,-0.58 1.04,0.58, body extent -0.81,-0.37 0.81,0.37
HDR1X5 [mm] "Connector; Header; 5 Position"
  rect 1.6x1.6 hole 0.95: 1(0,0)
  round 1.6 hole 0.95: 2(2.54,0) 3(5.08,0) 4(7.62,0) 5(10.16,0)
  silkscreen extent -1.27,-1.27 11.43,1.27, body extent -1.27,-1.27 11.43,1.23, height 8.65
HDR1X6 [mm] "Connector; Header; 6 Position"
  rect 1.5x1.5 hole 0.9: 1(0,0)
  round 1.5 hole 0.9: 2(2.54,0) 3(5.08,0) 4(7.62,0) 5(10.16,0) 6(12.7,0)
  silkscreen extent -1.27,-1.27 13.97,1.27, body extent -1.27,-1.24 13.97,1.25, height 8.54
ICS-40730 [mm]
  round 0.9 smd: 1(-1.17,1.2) 2(-1.17,0) 3(-1.17,-1.2)
  round 2.9 hole 2.3: 4(1.17,0)
  silkscreen extent -2.19,-1.88 2.87,1.88, body extent -1.85,-1.88 2.87,1.88, height 3.55
"IND 0402" [mm]
  rect 0.4x0.7 smd: 1(-0.4,0) 2(0.4,0)
  silkscreen extent -0.71,-0.46 0.74,0.48, body extent -0.5,-0.3 0.5,0.3, height 0.49
"IND 0603" [mm]
  rect 0.9x0.97 smd: 1(-0.785,0) 2(0.785,0)
  silkscreen extent -1.37,-0.61 1.37,0.61, body extent -0.8,-0.4 0.8,0.4, height 0.76
"JST Connector" [mil] "2 Pin JST Connector"
  round 75 hole 39: 1(0,0) 2(100,0)
  silkscreen extent -100,-90 200,135, body extent -98,-89 198,135, height 284
PCM1865DBTR [mm]
  rect 1.5x0.3 smd: 1(-2.9,3.5) 2(-2.9,3) 3(-2.9,2.5) 4(-2.9,2) 5(-2.9,1.5) 6(-2.9,1) 7(-2.9,0.5) 8(-2.9,0) 9(-2.9,-0.5) 10(-2.9,-1) 11(-2.9,-1.5) 12(-2.9,-2) 13(-2.9,-2.5) 14(-2.9,-3) 15(-2.9,-3.5) 16(2.9,-3.5) 17(2.9,-3) 18(2.9,-2.5) 19(2.9,-2) 20(2.9,-1.5) 21(2.9,-1) 22(2.9,-0.5) 23(2.9,0) 24(2.9,0.5) 25(2.9,1) 26(2.9,1.5) 27(2.9,2) 28(2.9,2.5) 29(2.9,3) 30(2.9,3.5)
  silkscreen extent -4.06,-3.94 1.98,3.94, body extent -3.2,-3.9 3.2,3.9, height 1.13
PRO-OB-440 [mm] "RF ANT 2.4GHZ STAMPED MET SLD"
  rect 1.5x1.2 smd: 1(1.865,5.35) 3(-1.865,5.35) 4(-1.865,-5.35)
  rect 1.5x1.28 smd: 2(1.865,3.15)
  silkscreen extent -2.67,-5.79 3.05,7.96, body extent -2.62,-5.74 2.62,8.01, height 3.5
Res0603 [mil]
  rect 30x35 smd: 1(-30,0) 2(30,0)
  silkscreen extent -48,-21 48,21, body extent -31,-17 31,17, height 18
S3224576121060 [mm] "24.576MHz SMD Crystal Resonator 12pF 60O ±10ppm -40?~+85? SMD3225-4P Crystals ROHS"
  rect 1.4x1.2 smd: 1(-1.1,-0.85) 2(1.1,-0.85) 3(1.1,0.85) 4(-1.1,0.85)
  silkscreen extent -2.18,-1.3 1.65,1.3, body extent -1.6,-1.25 1.6,1.25, height 0.82
SC70-6 [mm]
  rect 0.9x0.4 smd: 1(-1.1,0.65) 2(-1.1,0) 3(-1.1,-0.65) 4(1.1,-0.65) 5(1.1,0) 6(1.1,0.65)
  silkscreen extent -1.4,-1.04 0.46,1.17, body extent -1.05,-1 1.05,1, height 1.1
SOIC-8 [mm]
  rect 1.55x0.6 smd: 1(-2.7,1.905) 2(-2.7,0.635) 3(-2.7,-0.635) 4(-2.7,-1.905) 5(2.7,-1.905) 6(2.7,-0.635) 7(2.7,0.635) 8(2.7,1.905)
  silkscreen extent -3.41,-2.51 1.68,2.7, body extent -3,-2.45 3,2.45, height 1.7
"Solder Bridge" [mil] "Solder Bridge ON"
  rect 30x35 smd: 1(-30,0) 2(30,0)
  silkscreen extent -50,-22 50,22
SOP-8 [mm]
  rect 1.3x0.7 smd: 1(-2.75,1.905) 2(-2.75,0.635) 3(-2.75,-0.635) 4(-2.75,-1.905) 5(2.75,-1.905) 6(2.75,-0.635) 7(2.75,0.635) 8(2.75,1.905)
  silkscreen extent -3.35,-2.57 1.96,2.75, body extent -3.11,-2.5 3.11,2.5, height 1.87
SOT-25 [mm]
  rect 1x0.7 smd: 1(-1.2,0.95) 2(-1.2,0) 3(-1.2,-0.95) 4(1.2,-0.95) 5(1.2,0.95)
  silkscreen extent -1.63,-1.55 0.79,1.63, body extent -1.21,-1.5 1.19,1.5, height 1.1
TS-1185EC-C-D-B [mm]
  rect 1.25x0.9 smd: 1(-1.925,0.75) 1(1.925,0.75) 2(-1.925,-0.75) 2(1.925,-0.75)
  silkscreen extent -2.39,-1.52 1.73,1.68, body extent -2.33,-1.5 2.32,1.5, height 2
U262-061N-4BVC11 [mm]
  rect 0.7x1 smd: A5(0.5,2.125) A9(1.52,2.125) A12(2.75,2.125) B5(-0.5,2.125) B9(-1.52,2.125) B12(-2.75,2.125)
  oval 1x2 hole 0.5 slot 1.4 at 90 deg: MH1(-4.32,1.625) MH2(4.32,1.625) MH3(4.32,-2.125) MH4(-4.32,-2.125)
  silkscreen extent -4.52,-4.69 4.52,3.09, body extent -4.47,-4.69 4.47,2.4, height 3.3
U.FL-R-SMT-1(80) [mm]
  rect 1.02x1.07 smd: 1(0,-0.923)
  rect 1.07x2.2 smd: 2(1.475,1.025) 3(-1.475,1.025)
  silkscreen extent -1.52,-0.74 1.57,2.46, body extent -1.47,-0.69 1.53,2.41, height 1.2
UDD32C03L01 [mm]
  rect 0.5x0.6 smd: 1(-1.15,0) 2(1.15,0)
  silkscreen extent -0.91,-0.71 0.99,0.71, body extent -1.3,-0.67 1.3,0.67, height 1.1
UMH3N [mm]
  rect 0.8x0.4 smd: 1(-0.97,0.65) 2(-0.97,0) 3(-0.97,-0.65) 4(0.97,-0.65) 5(0.97,0) 6(0.97,0.65)
  silkscreen extent -1.25,-1.14 0.48,1.17, body extent -1.2,-1.1 1.2,1.1, height 1.08
"X1SON - 0.45 mm max height" [mm] "TVS 6A@80/20µs 14V 6V 5.5V@(MAX)"
  rect 0.3x0.5 smd: 1(-0.35,0) 2(0.35,0)
  silkscreen extent -0.58,-0.33 0.58,0.47, body extent -0.5,-0.3 0.5,0.3, height 0.45
X322540MPB4SI [mm]
  rect 1.4x1.2 smd: 1(-1.1,-0.85) 2(1.1,-0.85) 3(1.1,0.85) 4(-1.1,0.85)
  silkscreen extent -2.18,-1.3 1.65,1.3, body extent -1.6,-1.25 1.6,1.25, height 0.8

## Part data
C1 C56 C57: library part CL10A106MA8NRNC, "CAP CER 10UF 25V X5R 0603", Case Code (Imperial)=0603, Case Code (Metric)=1608, Dielectric=X5R, Manufacturer=Samsung, Max Operating Temperature=85°C, Min Operating Temperature=-55°C, Package Quantity=1, Tolerance=20%, Voltage Rating=25V, Capacitance=10uF, Case/Package=0603, Category="Ceramic Capacitors", ComponentLink1Description=https://datasheet.ciiva.com/25766/cl10a106ma8nrnc-25766562.pdf?src-supplier=Digi-Key, ComponentLink1URL=https://datasheet.ciiva.com/25766/cl10a106ma8nrnc-25766562.pdf?src-supplier=Digi-Key, Construction=Flat, Contact Plating=Tin, Lead Free="Lead Free", Length=0.063inch, Manufacturer Part Number=CL10A106MA8NRNC, Mount="Surface Mount", Packaging="Tape and Reel", Pricing 1="4000=0.03753, 8000=0.03700, 16000=0.03595, 24000=0.03515, 32000=0.03383, 40000=0.03304, 400000=0.03225 (USD)", RoHS=Yes, RoHS Compliant=Yes, Series=CL, Supplier 1=Avnet, Supplier Part Number 1=CL10A106MA8NRNC, Termination=Wraparound, Thickness=0.035inch, Width=0.031inch
C2: library part CL10A475KA8NQNC, "CAP CER 4.7UF 25V X5R 0603", Capacitance=4.7uF, Case Code (Imperial)=0603, Case Code (Metric)=1608, Dielectric=X5R, Manufacturer=Samsung, Max Operating Temperature=85°C, Min Operating Temperature=-55°C, Package Quantity=1, Supplier Part Number 1=1276-1900-1-ND, Tolerance=10%, Voltage Rating=25V, Case/Package=0603, ComponentLink1Description=http://www.samsungsem.com/kr/support/product-search/mlcc/CL10A475KA8NQNC.jsp?src-supplier=Digi-Key, ComponentLink1URL=http://www.samsungsem.com/kr/support/product-search/mlcc/CL10A475KA8NQNC.jsp?src-supplier=Digi-Key, Contact Plating=Tin, Depth=0.8mm, Lead Free="Lead Free", Length=1.6mm, Manufacturer Part Number=CL10A475KA8NQNC, Mount="Surface Mount", Packaging="Tape and Reel", Pricing 1="1=0.37, 10=0.255, 100=0.1528, 500=0.11456, 1000=0.09675 (USD)", Stock 1=2252340, Supplier 1=Digi-Key, Termination=Wraparound, Thickness=0.035inch, Width=0.031inch
C3 C5 C7 C9 C11 C13 C15 C17 C27 C29 C53 C55 C70 C72 C76 C78 C85 C#1 C#2: library part CC0603KRX5R8BB105, "CAP CER 1UF 25V X5R 0603", Case Code (Imperial)=0603, Case Code (Metric)=1608, Dielectric=X5R, Manufacturer=Yageo, Max Operating Temperature=85°C, Min Operating Temperature=-55°C, Package Quantity=1, Supplier Part Number 1=311-1445-1-ND, Tolerance=10%, Voltage Rating=25V, Capacitance=1uF, Case/Package=0603, Category="Ceramic Capacitors", ComponentLink1Description=https://datasheet.ciiva.com/176/mlccorderingcode-176785.pdf?src-supplier=Digi-Key, ComponentLink1URL=https://datasheet.ciiva.com/176/mlccorderingcode-176785.pdf?src-supplier=Digi-Key, ComponentLink2Description=https://datasheet.ciiva.com/176/mlccorderingcode-176786.pdf?src-supplier=Digi-Key, ComponentLink2URL=https://datasheet.ciiva.com/176/mlccorderingcode-176786.pdf?src-supplier=Digi-Key, ComponentLink3Description=https://datasheet.ciiva.com/176/mlccorderingcode-176787.pdf?src-supplier=Digi-Key, ComponentLink3URL=https://datasheet.ciiva.com/176/mlccorderingcode-176787.pdf?src-supplier=Digi-Key, ComponentLink4Description=https://datasheet.ciiva.com/17436/upy-gphc-x5r-4v-to-50v-12-17436952.pdf?src-supplier=Avnet+Europe, ComponentLink4URL=https://datasheet.ciiva.com/17436/upy-gphc-x5r-4v-to-50v-12-17436952.pdf?src-supplier=Avnet+Europe, ComponentLink5Description=https://datasheet.ciiva.com/7978/1525783-7978171.pdf?src-supplier=Element14, ComponentLink5URL=https://datasheet.ciiva.com/7978/1525783-7978171.pdf?src-supplier=Element14, ComponentLink6Description=https://datasheet.ciiva.com/11586/upy-gphc-x5r-4v-to-50v-12-11586318.pdf?src-supplier=Avnet, ComponentLink6URL=https://datasheet.ciiva.com/11586/upy-gphc-x5r-4v-to-50v-12-11586318.pdf?src-supplier=Avnet, Construction=Flat, Depth=0.8mm, Halogen Free="Halogen Free", Height=0.8mm, Lead Free="Lead Free", Length=1.6mm, Manufacturer Part Number=CC0603KRX5R8BB105, Mount="Surface Mount", Number of Pins=2, Packaging="Tape and Reel", Pricing 1="1=0.12000, 10=0.08400, 50=0.04760, 100=0.03940, 500=0.02764, 1000=0.02288 (USD)", Radiation Hardening=No, REACH SVHC="No SVHC", RoHS=Yes, RoHS Compliant=Yes, Series=CC, Stock 1=919939, Supplier 1=Digi-Key, Termination=SMD/SMT, Thickness=0.035inch, Voltage Rating (DC)=25V, Width=0.031inch
C4 C6 C8 C10 C12 C14 C16 C18: library part CC0402JRNPO9BN221, "CAP CER 220PF 50V C0G/NPO 0402", Case Code (Imperial)=0402, Case Code (Metric)=1005, Dielectric=C0G, Dielectric Material=Ceramic, Insulation Resistance=10GR, Manufacturer=Yageo, Max Operating Temperature=125°C, Min Operating Temperature=-55°C, Package Quantity=1, Supplier Part Number 1=6169284, Temperature Coefficient=30ppm/°C, Tolerance=10%, Voltage=50V, Capacitance=220pF, Case/Package=0402, Category="Ceramic Capacitors", ComponentLink1Description=https://datasheet.ciiva.com/11786/0900766b8079c870-11786154.pdf?src-supplier=RSComponents, ComponentLink1URL=https://datasheet.ciiva.com/11786/0900766b8079c870-11786154.pdf?src-supplier=RSComponents, ComponentLink2Description=https://datasheet.ciiva.com/7656/1132289-7656616.pdf?src-supplier=Element14, ComponentLink2URL=https://datasheet.ciiva.com/7656/1132289-7656616.pdf?src-supplier=Element14, ComponentLink3Description=https://datasheet.ciiva.com/8033/1443161-8033609.pdf?src-supplier=Element14, ComponentLink3URL=https://datasheet.ciiva.com/8033/1443161-8033609.pdf?src-supplier=Element14, ComponentLink4Description=https://datasheet.ciiva.com/8033/1443161-8033608.pdf?src-supplier=Element14, ComponentLink4URL=https://datasheet.ciiva.com/8033/1443161-8033608.pdf?src-supplier=Element14, ComponentLink5Description=https://datasheet.ciiva.com/176/mlccorderingcode-176384.pdf?src-supplier=Digi-Key, ComponentLink5URL=https://datasheet.ciiva.com/176/mlccorderingcode-176384.pdf?src-supplier=Digi-Key, ComponentLink6Description=https://datasheet.ciiva.com/176/mlccorderingcode-176383.pdf?src-supplier=Digi-Key, ComponentLink6URL=https://datasheet.ciiva.com/176/mlccorderingcode-176383.pdf?src-supplier=Digi-Key, ComponentLink7Description=https://datasheet.ciiva.com/176/mlccorderingcode-176385.pdf?src-supplier=Digi-Key, ComponentLink7URL=https://datasheet.ciiva.com/176/mlccorderingcode-176385.pdf?src-supplier=Digi-Key, ComponentLink8Description=https://datasheet.ciiva.com/17434/upy-gp-np0-16v-to-50v-8-17434343.pdf?src-supplier=Avnet+Europe, ComponentLink8URL=https://datasheet.ciiva.com/17434/upy-gp-np0-16v-to-50v-8-17434343.pdf?src-supplier=Avnet+Europe, Depth=0.5mm, Dissipation Factor=0.1%, Height=0.5mm, Lead Free="Lead Free", Length=1mm, Manufacturer Part Number=CC0402JRNPO9BN221, Mount="Surface Mount", Number of Pins=2, Packaging="Tape and Reel", Pricing 1="10000=0.00600, 100000=0.00600 (GBP)", Radiation Hardening=No, REACH SVHC="No SVHC", RoHS=Yes, RoHS Compliant=Yes, Series=CC, Stock 1=20000, Supplier 1=RSComponents, Termination=SMD/SMT, Thickness=0.022inch, Voltage Rating=50V, Width=0.02inch
C19 C20: library part 04025A220FAT2A, "CAP CER 22PF 50V C0G/NP0 0402", Capacitance=22pF, Case Code (Imperial)=0402, Case Code (Metric)=1005, Dielectric=C0G, Manufacturer="Kyocera AVX", Max Operating Temperature=125°C, Min Operating Temperature=-55°C, Package Quantity=1, Supplier Part Number 1=478-5765-1-ND, Tolerance=1%, Voltage Rating=50V, Case/Package=0402, ComponentLink1Description=http://psearch.murata.com/capacitor/product/GCM219R71C105KA37%23.pdf, ComponentLink1URL=http://psearch.murata.com/capacitor/product/GCM219R71C105KA37%23.pdf, ComponentLink2Description=http://search.murata.co.jp/Ceramy/image/img/A01X/partnumbering_e_02.pdf, ComponentLink2URL=http://search.murata.co.jp/Ceramy/image/img/A01X/partnumbering_e_02.pdf, ComponentLink3Description=http://psearch.en.murata.com/capacitor/product/GCM219R71C105KA37%23.pdf, ComponentLink3URL=http://psearch.en.murata.com/capacitor/product/GCM219R71C105KA37%23.pdf, ComponentLink4Description=http://uk.rs-online.com/webdocs/0ef9/0900766b80ef92d0.pdf, ComponentLink4URL=http://uk.rs-online.com/webdocs/0ef9/0900766b80ef92d0.pdf, ComponentLink5Description=http://www.yageo.com/documents/recent/UPY-GP_NP0_16V-to-50V_16.pdf, ComponentLink5URL=http://www.yageo.com/documents/recent/UPY-GP_NP0_16V-to-50V_16.pdf, ComponentLink6Description=http://www.farnell.com/datasheets/1443161.pdf, ComponentLink6URL=http://www.farnell.com/datasheets/1443161.pdf, ComponentLink7Description=http://www.yageo.com/documents/recent/UPY-GP_NP0_16V-to-50V_8.pdf, ComponentLink7URL=http://www.yageo.com/documents/recent/UPY-GP_NP0_16V-to-50V_8.pdf, ComponentLink8Description=http://www.farnell.com/datasheets/1132289.pdf, ComponentLink8URL=http://www.farnell.com/datasheets/1132289.pdf, ComponentLink9Description=http://www.mouser.com/ds/2/447/Yageo_UPY-GP_NP0_16V-to-50V_9-358835.pdf, ComponentLink9URL=http://www.mouser.com/ds/2/447/Yageo_UPY-GP_NP0_16V-to-50V_9-358835.pdf, ComponentLink10Description=https://www.verical.com/server-webapp/html/getDatasheet?partID=370074, ComponentLink10URL=https://www.verical.com/server-webapp/html/getDatasheet?partID=370074, ComponentLink11Description=http://catalogs.avx.com/SurfaceMount.pdf, ComponentLink11URL=http://catalogs.avx.com/SurfaceMount.pdf, ComponentLink12Description=http://www.avxcorp.com/docs/Catalogs/ccog.pdf, ComponentLink12URL=http://www.avxcorp.com/docs/Catalogs/ccog.pdf, ComponentLink13Description=http://www.mouser.com/ds/2/40/C0GNP0-Dielectric-951274.pdf, ComponentLink13URL=http://www.mouser.com/ds/2/40/C0GNP0-Dielectric-951274.pdf, Contact Plating=Matte,Tin, Depth=0.5mm, Height=0.56mm, Lead Free="Lead Free", Length=1mm, Manufacturer Part Number=04025A220FAT2A, Mount="Surface Mount", Packaging="Tape and Reel", Pricing 1="1=0.67, 10=0.472, 100=0.3105, 500=0.23, 1000=0.1955, 2500=0.184, 5000=0.1725 (USD)", Radiation Hardening=No, REACH SVHC=Unknown, Stock 1=100000, Supplier 1=Digi-Key, Termination=SMD/SMT, Thickness=0.022inch, Voltage Rating (DC)=50V, Width=0.02inch
C21 C22 C23 C24 C25 C26 C28 C30 C31 C32 C33 C34 C35 C37 C38 C39 C40 C41 C42 C54 C58 C59 C71 C77 C79 C81 C82 C84 C87: library part CC0603KRX7R0BB104, "CAP CER 0.1UF 100V X7R 0603", Capacitance=100nF, Case Code (Imperial)=0603, Case Code (Metric)=1608, Dielectric=X7R, Manufacturer=Yageo, Max Operating Temperature=125°C, Min Operating Temperature=-55°C, Package Quantity=4000, Resistor Type=Ceramic, Supplier Part Number 1=311-1523-1-ND, Tolerance=10%, Voltage Rating=100V, Case/Package=0603, Category="Ceramic Capacitors", ComponentLink1Description=https://datasheet.ciiva.com/6277/mlccorderingcode-6277030.pdf?src-supplier=Digi-Key, ComponentLink1URL=https://datasheet.ciiva.com/6277/mlccorderingcode-6277030.pdf?src-supplier=Digi-Key, ComponentLink2Description=https://datasheet.ciiva.com/6277/mlccorderingcode-6277081.pdf?src-supplier=Digi-Key, ComponentLink2URL=https://datasheet.ciiva.com/6277/mlccorderingcode-6277081.pdf?src-supplier=Digi-Key, ComponentLink3Description=https://datasheet.ciiva.com/6277/mlccorderingcode-6277082.pdf?src-supplier=Digi-Key, ComponentLink3URL=https://datasheet.ciiva.com/6277/mlccorderingcode-6277082.pdf?src-supplier=Digi-Key, Depth=0.8mm, Lead Free="Lead Free", Length=0.063inch, Manufacturer Part Number=CC0603KRX7R0BB104, Mount="Surface Mount", Packaging="Tape and Reel", Pricing 1="1=0.19000, 10=0.13500, 50=0.07680, 100=0.06370, 500=0.04466, 1000=0.03696 (USD)", RoHS=Yes, RoHS Compliant=Yes, Series=CC, Stock 1=60476, Supplier 1=Digi-Key, Termination=SMD/SMT, Thickness=0.035inch, Voltage Rating (DC)=100V, Weight=7.1E-05oz, Width=0.031inch
C36: library part UMK107C7224KAHTE, "CAP CER 0.22UF 50V X7S 0603", Case/Package=0603, Manufacturer="Taiyo Yuden", Max Operating Temperature=125°C, Min Operating Temperature=-55°C, Ratings=AEC-Q200, Supplier Part Number 1=1843164, Tolerance=10%, Voltage Rating=50V, Capacitance=220nF, Category="Ceramic Capacitors", ComponentLink1Description=http://ds.yuden.co.jp/TYCOMPAS/ut/detail.do?productNo=UMK107C7224KAHTE&fileName=UMK107C7224KAHTE_SS&mode=specSheetDownload&src-supplier=Digi-Key, ComponentLink1URL=http://ds.yuden.co.jp/TYCOMPAS/ut/detail.do?productNo=UMK107C7224KAHTE&fileName=UMK107C7224KAHTE_SS&mode=specSheetDownload&src-supplier=Digi-Key, Manufacturer Part Number=UMK107C7224KAHTE, Mount="Surface Mount", Packaging="Cut Tape", Pricing 1="4000=0.05100, 8000=0.04300 (USD)", RoHS=Yes, Stock 1=1, Supplier 1=RSComponents
C43 C44 C61 C62 C73 C74: library part CC0603JRNPO9BN180, "CAP SMD 18pF ±5.0% 50V NPO 0603", Case Code (Imperial)=0603, Case Code (Metric)=1608, Dielectric=C0G, Insulation Resistance=100GR, Manufacturer=Yageo, Max Operating Temperature=125°C, Min Operating Temperature=-55°C, Package Quantity=1, Resistor Type=Ceramic, Supplier Part Number 1=68R4719, Temperature Coefficient=30ppm/°C, Tolerance=5%, Voltage Rating=50V, Capacitance=18pF, Case/Package=0603, Category="Ceramic Capacitors", ComponentLink1Description=https://datasheet.ciiva.com/144/mlccorderingcode-144638.pdf?src-supplier=Digi-Key, ComponentLink1URL=https://datasheet.ciiva.com/144/mlccorderingcode-144638.pdf?src-supplier=Digi-Key, ComponentLink2Description=https://datasheet.ciiva.com/144/mlccorderingcode-144637.pdf?src-supplier=Digi-Key, ComponentLink2URL=https://datasheet.ciiva.com/144/mlccorderingcode-144637.pdf?src-supplier=Digi-Key, ComponentLink3Description=https://datasheet.ciiva.com/144/mlccorderingcode-144639.pdf?src-supplier=Digi-Key, ComponentLink3URL=https://datasheet.ciiva.com/144/mlccorderingcode-144639.pdf?src-supplier=Digi-Key, ComponentLink4Description=https://datasheet.ciiva.com/28450/1443161-28450477.pdf?src-supplier=Element14, ComponentLink4URL=https://datasheet.ciiva.com/28450/1443161-28450477.pdf?src-supplier=Element14, ComponentLink5Description=https://datasheet.ciiva.com/46430/1835847-46430152.pdf?src-supplier=Element14, ComponentLink5URL=https://datasheet.ciiva.com/46430/1835847-46430152.pdf?src-supplier=Element14, ComponentLink6Description=https://datasheet.ciiva.com/5425/upy-gp-np0-16v-to-50v-8-5425439.pdf?src-supplier=Mouser, ComponentLink6URL=https://datasheet.ciiva.com/5425/upy-gp-np0-16v-to-50v-8-5425439.pdf?src-supplier=Mouser, ComponentLink7Description=https://datasheet.ciiva.com/8033/1734582-8033733.pdf?src-supplier=Element14, ComponentLink7URL=https://datasheet.ciiva.com/8033/1734582-8033733.pdf?src-supplier=Element14, ComponentLink8Description=https://datasheet.ciiva.com/11587/upy-gp-np0-16v-to-50v-8-11587323.pdf?src-supplier=Avnet, ComponentLink8URL=https://datasheet.ciiva.com/11587/upy-gp-np0-16v-to-50v-8-11587323.pdf?src-supplier=Avnet, Depth=0.8mm, Height=0.8mm, Lead Free="Lead Free", Length=1.6mm, Manufacturer Part Number=CC0603JRNPO9BN180, Mount="Surface Mount", Number of Pins=2, Packaging="Tape and Reel", Pricing 1="1=0.09900, 25=0.08000, 50=0.06900, 100=0.04700, 250=0.03600, 500=0.02800, 1000=0.02300, 2500=0.01900 (USD)", Radiation Hardening=No, REACH SVHC="No SVHC", RoHS=Yes, RoHS Compliant=Yes, Series=CC, Stock 1=77880, Supplier 1=Newark, Termination=SMD/SMT, Thickness=0.035inch, Voltage Rating (DC)=50V, Width=0.031inch
C45 C46 C47 C48 C49 C50 C51 C52 C60 C63 C64 C65 C66 C67 C68 C69: library part CC0603KRX7R8BB684, "CAP CER 0.68uF 25V X7R 10% 0603 Paper T/R", Manufacturer=Yageo, Category="Ceramic Capacitors", Manufacturer Part Number=CC0603KRX7R8BB684, Pricing 1="4000=0.02130, 8000=0.01830 (USD)", RoHS=Yes, Stock 1=8000, Supplier 1="Arrow Electronics", Supplier Part Number 1=CC0603KRX7R8BB684
C75: library part CL10A106MA8NRNC, "CAP CER 10UF 25V X5R 0603", Capacitance=10uF, Case Code (Imperial)=0603, Case Code (Metric)=1608, Dielectric=X5R, Manufacturer=Samsung, Max Operating Temperature=85°C, Min Operating Temperature=-55°C, Package Quantity=1, Tolerance=20%, Voltage Rating=25V, Case/Package=0603, Category="Ceramic Capacitors", ComponentLink1Description=https://datasheet.ciiva.com/25766/cl10a106ma8nrnc-25766562.pdf?src-supplier=Digi-Key, ComponentLink1URL=https://datasheet.ciiva.com/25766/cl10a106ma8nrnc-25766562.pdf?src-supplier=Digi-Key, Construction=Flat, Contact Plating=Tin, Lead Free="Lead Free", Length=0.063inch, Manufacturer Part Number=CL10A106MA8NRNC, Mount="Surface Mount", Packaging="Tape and Reel", Pricing 1="4000=0.03753, 8000=0.03700, 16000=0.03595, 24000=0.03515, 32000=0.03383, 40000=0.03304, 400000=0.03225 (USD)", RoHS=Yes, RoHS Compliant=Yes, Series=CL, Supplier 1=Avnet, Supplier Part Number 1=CL10A106MA8NRNC, Termination=Wraparound, Thickness=0.035inch, Width=0.031inch
C80: library part CC0603KRX7R8BB101, "CAP CER 100PF 25V X7R 0603", Case Code (Imperial)=0603, Case Code (Metric)=1608, Dielectric=X7R, Manufacturer=Yageo, Max Operating Temperature=125°C, Min Operating Temperature=-55°C, Resistor Type=Ceramic, Tolerance=10%, Voltage Rating=25V, Capacitance=100pF, Case/Package=0603, Category="Ceramic Capacitors", ComponentLink1Description=https://datasheet.ciiva.com/13265/upy-gphc-x7r-6-3v-to-50v-8-12304-13265007.pdf?src-supplier=Mouser, ComponentLink1URL=https://datasheet.ciiva.com/13265/upy-gphc-x7r-6-3v-to-50v-8-12304-13265007.pdf?src-supplier=Mouser, Depth=0.8mm, Halogen Free="Halogen Free", Lead Free="Lead Free", Length=0.063inch, Manufacturer Part Number=CC0603KRX7R8BB101, Mount="Surface Mount", Packaging="Tape and Reel", Pricing 1="4000=0.00493, 8000=0.00479, 16000=0.00466, 24000=0.00452, 32000=0.00439 (USD)", RoHS=Yes, RoHS Compliant=Yes, Series=CC, Stock 1=12000, Supplier 1=Avnet, Supplier Part Number 1=CC0603KRX7R8BB101, Termination=SMD/SMT, Thickness=0.035inch, Voltage Rating (DC)=25V, Weight=7.1E-05oz, Width=0.031inch
C83: library part CGA2B2X7R1H332M050BA, "CAP CER 3300PF 50V X7R 0402", Case Code (Imperial)=0402, Case Code (Metric)=1005, Manufacturer=TDK, Max Operating Temperature=125°C, Min Operating Temperature=-55°C, Package Quantity=10000, Ratings=AEC-Q200, Supplier Part Number 1=445-12276-1-ND, Tolerance=20%, Voltage Rating=50V, Capacitance=3.3nF, Case/Package=0402, Category="Ceramic Capacitors", ComponentLink1Description=https://product.tdk.com/info/en/documents/chara_sheet/CGA2B2X7R1H332M050BA.pdf?src-supplier=Digi-Key, ComponentLink1URL=https://product.tdk.com/info/en/documents/chara_sheet/CGA2B2X7R1H332M050BA.pdf?src-supplier=Digi-Key, ComponentLink2Description=https://product.tdk.com/info/en/catalog/datasheets/mlcc_automotive_general_en.pdf?src-supplier=Digi-Key, ComponentLink2URL=https://product.tdk.com/info/en/catalog/datasheets/mlcc_automotive_general_en.pdf?src-supplier=Digi-Key, ComponentLink3Description=http://product.tdk.com/en/catalog/datasheets/mlcc_automotive_general_en.pdf?src-supplier=Avnet, ComponentLink3URL=http://product.tdk.com/en/catalog/datasheets/mlcc_automotive_general_en.pdf?src-supplier=Avnet, Length=0.039inch, Manufacturer Part Number=CGA2B2X7R1H332M050BA, Mount="Surface Mount", Packaging="Tape and Reel", Pricing 1="1=0.10000, 10=0.05400, 50=0.02960, 100=0.02430, 500=0.01732, 1000=0.01361, 2500=0.01238, 5000=0.01138 (USD)", RoHS=Yes, RoHS Compliant=Yes, Series=CGA, Stock 1=30365, Supplier 1=Digi-Key, Thickness=0.022inch, Width=0.02inch
C86: library part CC0603KRX7R8BB472, "CAP SMD 4700pF ±10% 25V X7R 0603", Case Code (Imperial)=0603, Case Code (Metric)=1608, Dielectric=X7R, Manufacturer=Yageo, Max Operating Temperature=125°C, Min Operating Temperature=-55°C, Resistor Type=Ceramic, Supplier Part Number 1=603-CC603KRX7R8BB472, Tolerance=10%, Voltage Rating=25V, Capacitance=4.7nF, Case/Package=0603, Category="Ceramic Capacitors", ComponentLink1Description=https://datasheet.ciiva.com/26862/getdatasheetpartid-650523-26862841.pdf?src-supplier=Verical, ComponentLink1URL=https://datasheet.ciiva.com/26862/getdatasheetpartid-650523-26862841.pdf?src-supplier=Verical, ComponentLink2Description=https://datasheet.ciiva.com/13208/upy-gphc-x7r-6-3v-to-50v-8-12304-13208589.pdf?src-supplier=Mouser, ComponentLink2URL=https://datasheet.ciiva.com/13208/upy-gphc-x7r-6-3v-to-50v-8-12304-13208589.pdf?src-supplier=Mouser, Depth=0.8mm, Halogen Free="Halogen Free", Lead Free="Lead Free", Length=1.6mm, Manufacturer Part Number=CC0603KRX7R8BB472, Mount="Surface Mount", Packaging="Tape and Reel", Pricing 1="1=0.10000, 10=0.02900, 50=0.02900, 100=0.02400, 500=0.01700, 1000=0.01400, 2000=0.01300, 4000=0.01000, 8000=0.00900, 10000=0.00900 (USD)", Radiation Hardening=No, RoHS=Yes, RoHS Compliant=Yes, Series=CC, Stock 1=6256, Supplier 1=Mouser, Termination=SMD/SMT, Thickness=0.035inch, Voltage Rating (DC)=25V, Weight=7.1E-05oz, Width=0.031inch
C88 C89: library part CC0603KRX7R8BB333, "CAP CER 33000pF ±10% 25V X7R 0603", Case Code (Imperial)=0603, Case Code (Metric)=1608, Dielectric=X7R, Manufacturer=Yageo, Max Operating Temperature=125°C, Min Operating Temperature=-55°C, Resistor Type=Ceramic, Supplier Part Number 1=50AJ2719, Tolerance=10%, Voltage Rating=25V, Capacitance=33nF, Case/Package=0603, Category="Ceramic Capacitors", ComponentLink1Description=https://datasheet.ciiva.com/11465/upy-gphc-x7r-6-3v-to-50v-8-11465208.pdf?src-supplier=Avnet, ComponentLink1URL=https://datasheet.ciiva.com/11465/upy-gphc-x7r-6-3v-to-50v-8-11465208.pdf?src-supplier=Avnet, ComponentLink2Description=https://datasheet.ciiva.com/15189/getdatasheetpartid-355839-15189164.pdf?src-supplier=Verical, ComponentLink2URL=https://datasheet.ciiva.com/15189/getdatasheetpartid-355839-15189164.pdf?src-supplier=Verical, Depth=0.8mm, Halogen Free="Halogen Free", Height=0.8mm, Lead Free="Lead Free", Length=1.6mm, Manufacturer Part Number=CC0603KRX7R8BB333, Mount="Surface Mount", Number of Pins=2, Packaging="Tape and Reel", Pricing 1="1=0.01800, 4000=0.01800, 8000=0.01300 (USD)", Radiation Hardening=No, RoHS=Yes, RoHS Compliant=Yes, Series=CC, Stock 1=52000, Supplier 1=Newark, Termination=SMD/SMT, Thickness=0.035inch, Voltage Rating (DC)=25V, Weight=7.1E-05oz, Width=0.031inch
C90: library part CC0603CRNPO9BN2R7, "CAP SMD  2.7pF ±0.25pF 50V NPO 0603", Case Code (Imperial)=0603, Case Code (Metric)=1608, Dielectric=C0G, Insulation Resistance=10GR, Manufacturer=Yageo, Max Operating Temperature=125°C, Min Operating Temperature=-55°C, Resistor Type=Ceramic, Supplier Part Number 1=46WX090, Voltage=50V, Capacitance=2.7pF, Case/Package=0603, Category="Ceramic Capacitors", ComponentLink1Description=https://datasheet.ciiva.com/11786/0900766b8079c870-11786434.pdf?src-supplier=RSComponents, ComponentLink1URL=https://datasheet.ciiva.com/11786/0900766b8079c870-11786434.pdf?src-supplier=RSComponents, ComponentLink2Description=https://datasheet.ciiva.com/13265/upy-gp-np0-16v-to-50v-8-3714-13265174.pdf?src-supplier=Mouser, ComponentLink2URL=https://datasheet.ciiva.com/13265/upy-gp-np0-16v-to-50v-8-3714-13265174.pdf?src-supplier=Mouser, ComponentLink3Description=https://datasheet.ciiva.com/8033/1443161-8033693.pdf?src-supplier=Element14, ComponentLink3URL=https://datasheet.ciiva.com/8033/1443161-8033693.pdf?src-supplier=Element14, ComponentLink4Description=https://datasheet.ciiva.com/11586/upy-gp-np0-16v-to-50v-8-11586442.pdf?src-supplier=Avnet, ComponentLink4URL=https://datasheet.ciiva.com/11586/upy-gp-np0-16v-to-50v-8-11586442.pdf?src-supplier=Avnet, Depth=0.8mm, Height=0.8mm, Lead Free="Lead Free", Length=1.6mm, Manufacturer Part Number=CC0603CRNPO9BN2R7, Mount="Surface Mount", Packaging="Tape and Reel", Pricing 1="1=0.10000, 10=0.05800, 25=0.04700, 50=0.03700, 100=0.02600 (USD)", REACH SVHC=Unknown, RoHS=Yes, RoHS Compliant=Yes, Series=CC, Stock 1=2084, Supplier 1=Newark, Termination=SMD/SMT, Thickness=0.035inch, Voltage Rating=50V, Voltage Rating (DC)=50V, Weight=7.1E-05oz, Width=0.8mm
C91: library part CC0603BRNPO9BN4R7, "CAP SMD 4.7pF ±0.1pF 50V NPO 0603", Case Code (Imperial)=0603, Case Code (Metric)=1608, Dielectric=C0G, Manufacturer=Yageo, Max Operating Temperature=125°C, Min Operating Temperature=-55°C, Package Quantity=4000, Resistor Type=Ceramic, Supplier Part Number 1=50AJ2583, Tolerance=5%, Voltage=50V, Capacitance=4.7pF, Case/Package=0603, Category="Ceramic Capacitors", ComponentLink1Description=http://www.mouser.com/ds/2/447/Yageo_UPY-GP_NP0_16V-to-50V_9-358835.pdf?src-supplier=Mouser, ComponentLink1URL=http://www.mouser.com/ds/2/447/Yageo_UPY-GP_NP0_16V-to-50V_9-358835.pdf?src-supplier=Mouser, ComponentLink2Description=https://www.verical.com/server-webapp/html/getDatasheet?partID=403493&src-supplier=Verical, ComponentLink2URL=https://www.verical.com/server-webapp/html/getDatasheet?partID=403493&src-supplier=Verical, ComponentLink3Description=http://www.yageo.com/documents/recent/UPY-GP_NP0_16V-to-50V_16.pdf?src-supplier=Digi-Key, ComponentLink3URL=http://www.yageo.com/documents/recent/UPY-GP_NP0_16V-to-50V_16.pdf?src-supplier=Digi-Key, ComponentLink4Description=https://www.yageo.com/upload/media/product/productsearch/datasheet/mlcc/UPY-GP_NP0_16V-to-50V_18.pdf?src-supplier=Digi-Key, ComponentLink4URL=https://www.yageo.com/upload/media/product/productsearch/datasheet/mlcc/UPY-GP_NP0_16V-to-50V_18.pdf?src-supplier=Digi-Key, ComponentLink5Description=http://www.yageo.com/documents/recent/UPY-GP_NP0_16V-to-50V_6.pdf?src-supplier=Avnet, ComponentLink5URL=http://www.yageo.com/documents/recent/UPY-GP_NP0_16V-to-50V_6.pdf?src-supplier=Avnet, ComponentLink6Description=http://www.yageo.com/documents/recent/UPY-GP_NP0_16V-to-50V_9.pdf?src-supplier=Future+Electronics, ComponentLink6URL=http://www.yageo.com/documents/recent/UPY-GP_NP0_16V-to-50V_9.pdf?src-supplier=Future+Electronics, ComponentLink7Description=http://www.yageo.com/exep/pages/download/literatures/ProductSelectionGuide%202014_Final_2.pdf?src-supplier=Digi-Key, ComponentLink7URL=http://www.yageo.com/exep/pages/download/literatures/ProductSelectionGuide%202014_Final_2.pdf?src-supplier=Digi-Key, Depth=0.8mm, Height=0.8mm, Lead Free="Lead Free", Length=1.6mm, Manufacturer Part Number=CC0603BRNPO9BN4R7, Mount="Surface Mount", Packaging="Tape and Reel", Pricing 1="1=0.02700, 4000=0.02300, 8000=0.01900, 16000=0.01400 (USD)", Radiation Hardening=No, RoHS=Yes, RoHS Compliant=Yes, Series=CC, Stock 1=108000, Supplier 1=Newark, Termination=SMD/SMT, Thickness=0.035inch, Voltage Rating=50V, Voltage Rating (DC)=50V, Width=0.8mm
D1: "15V 19A 3.3V 4V Bidirectional SOD-323 ESD Protection Devices ROHS", Manufacturer=Brightking, Package=SOD-323, ComponentLink1Description=LCSC, ComponentLink1URL=https://lcsc.com/product-detail/span-style-background-color-ff0-ESD-span-Protection-Devices_Brightking-Elec-TAIWAN-UDD32C03L01_C78439.html, Manufacturer Part No=UDD32C03L01